# Altium PCB TPS259474LRPWR.pcbdoc
Units mil, origin at the board's own origin, x right, y up, seen from the top; angles counter-clockwise.
Board outline 625.77 x 604.11 mil, 2 copper layers (Top Layer, Bottom Layer), stack 0 mil thick; 1 components, 0 nets, 10 pads, 0 vias.
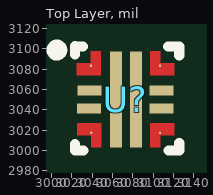
[diagram p0: Top Layer view]
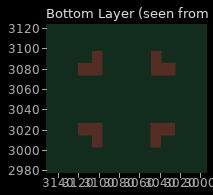
[diagram p1: Bottom Layer view, seen from below]

## Layer stack, top to bottom
Top Layer: signal copper (thickness not stored)
Bottom Layer: signal copper (thickness not stored)

## Board outline
3375.77,2750 2750,2750 2750,3354.11 3375.77,3354.11

## Design rules (kind name [scope] priority, off if disabled: settings)
Clearance [All] p1: gap=10 ignorepadtopadclearanceinfootprint=FALSE except(0: Arc-Hole Track-Hole SMDPad-Hole THPad-Hole Via-Hole Fill-Hole Poly-Hole Region-Hole Text-Hole)
PolygonConnect [All] p1: connectstyle=Relief reliefconductorwidth=10 reliefentries=4 polygonreliefangle="90 Angle" airgapwidth=10
RoutingVias [All] p1: holewidth=28 width=50 viastyle="Through Hole" minholewidth=28 minwidth=50 maxholewidth=28 maxwidth=50
SolderMaskExpansion [All] p1: expansion=4 istentingtop=FALSE
Width [All] p1: maxlimit=10 minlimit=10 preferedwidth=10
30 further rules are at their usual default settings.

## Components (designator, comment, footprint, x,y, rotation, side; value= is the part's Value field where it differs from the comment)
U? "TPS259474LRPWR" VQFN-10_L2.0-W2.0-P0.45-TL 3072.82,3050.39 r0 top

## Footprints (in the part's own frame and the unit in brackets; to place one, negate y for a bottom-side part, rotate by r counter-clockwise, add the part's x,y. Pads: shape width x height; smd on the part's side, far side on the other; paste and mask are expansions set on the pad)
VQFN-10_L2.0-W2.0-P0.45-TL [mm]
  round 0.062 smd: 1(-0.864,0.838) 4(-0.854,-0.838) 7(0.864,-0.838) 10(0.864,0.838)
  rect 0.6x0.25 smd paste+0 mask+0.05: 2(-0.905,0.225) 3(-0.905,-0.225) 8(0.905,-0.225) 9(0.905,0.225)
  rect 0.3x2.4 smd paste+0 mask+0.05: 5(-0.235,0) 6(0.265,0)
  Top Layer region: -0.865,1.2 -0.865,0.9 -1.215,0.9 -1.215,0.6 -0.865,0.6 -0.615,0.6 -0.615,0.6 -0.615,0.9 -0.615,0.9 -0.615,1.2
  Top Layer region: -0.855,-1.2 -0.855,-0.9 -1.205,-0.9 -1.205,-0.6 -0.855,-0.6 -0.605,-0.6 -0.605,-0.6 -0.605,-0.9 -0.605,-0.9 -0.605,-1.2
  Top Layer region: 0.865,-1.2 0.865,-0.9 1.215,-0.9 1.215,-0.6 0.865,-0.6 0.615,-0.6 0.615,-0.6 0.615,-0.9 0.615,-0.9 0.615,-1.2
  Top Layer region: 0.865,1.2 0.865,0.9 1.215,0.9 1.215,0.6 0.865,0.6 0.615,0.6 0.615,0.6 0.615,0.9 0.615,0.9 0.615,1.2
  silkscreen extent -1.85,-1.28 1.34,1.36

## Nets (pads, with @x,y where several pads share a name; then routed paths per layer and width w, separated by ;. In a path a pad name is that pad's centre, name@x,y a point inside that pad or via, vN(x,y) a via of type N, cw(c..) or ccw(c..) an arc to the next point about the centre after c; other vN are vias at no path point)
pads on no net: U?.1 U?.2 U?.3 U?.4 U?.5 U?.6 U?.7 U?.8 U?.9 U?.10